# EAGLE board 2026-10-24_14-24-42 (EAGLE 6.4)
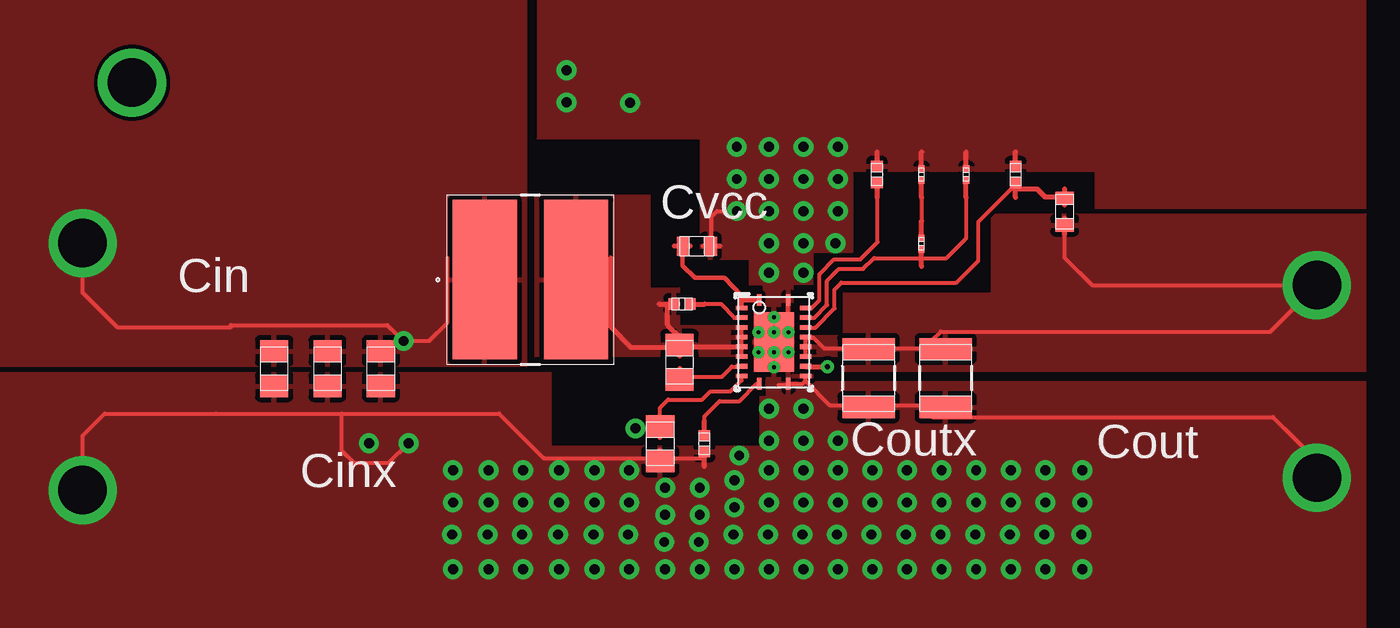
[diagram p0: board, top side]
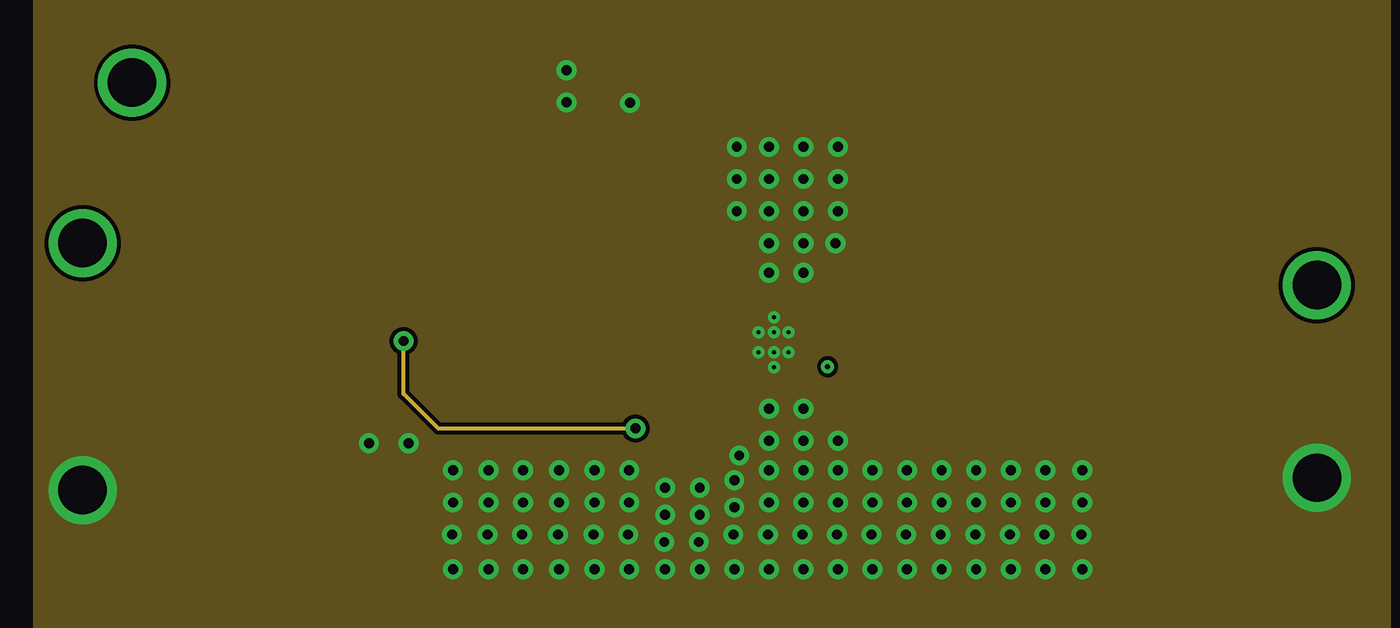
[diagram p1: board, inner layer INTERNAL1]
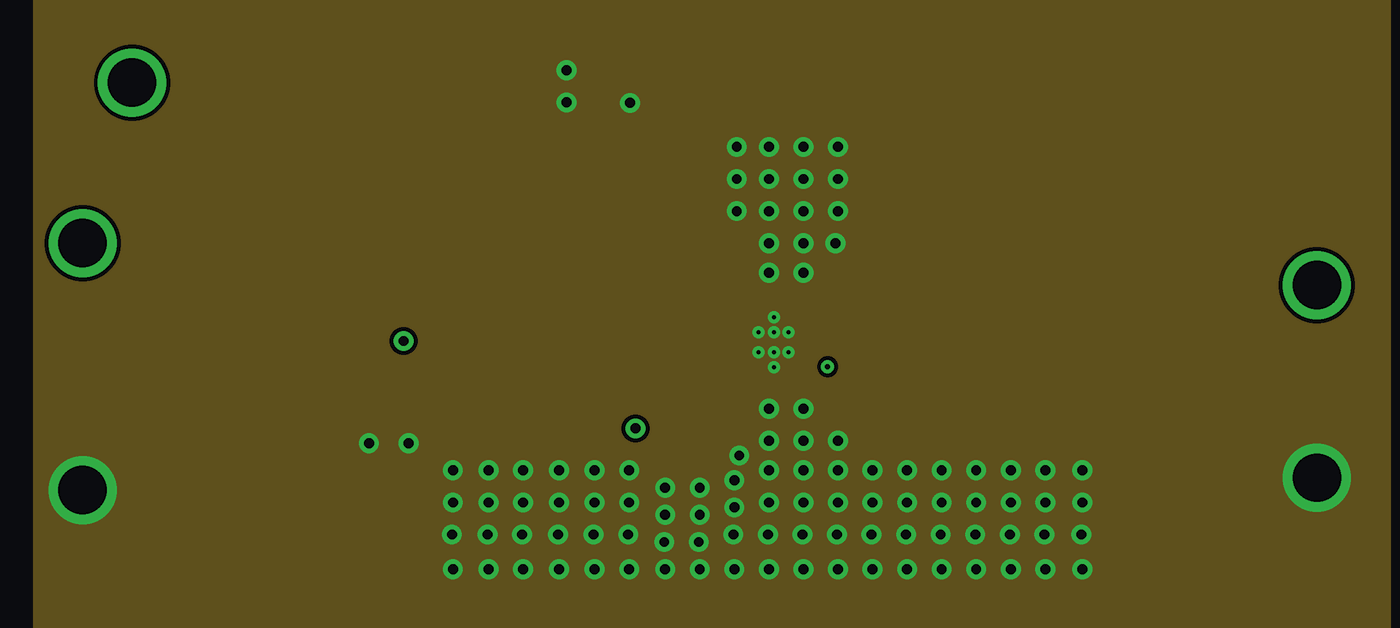
[diagram p2: board, inner layer INTERNAL2]
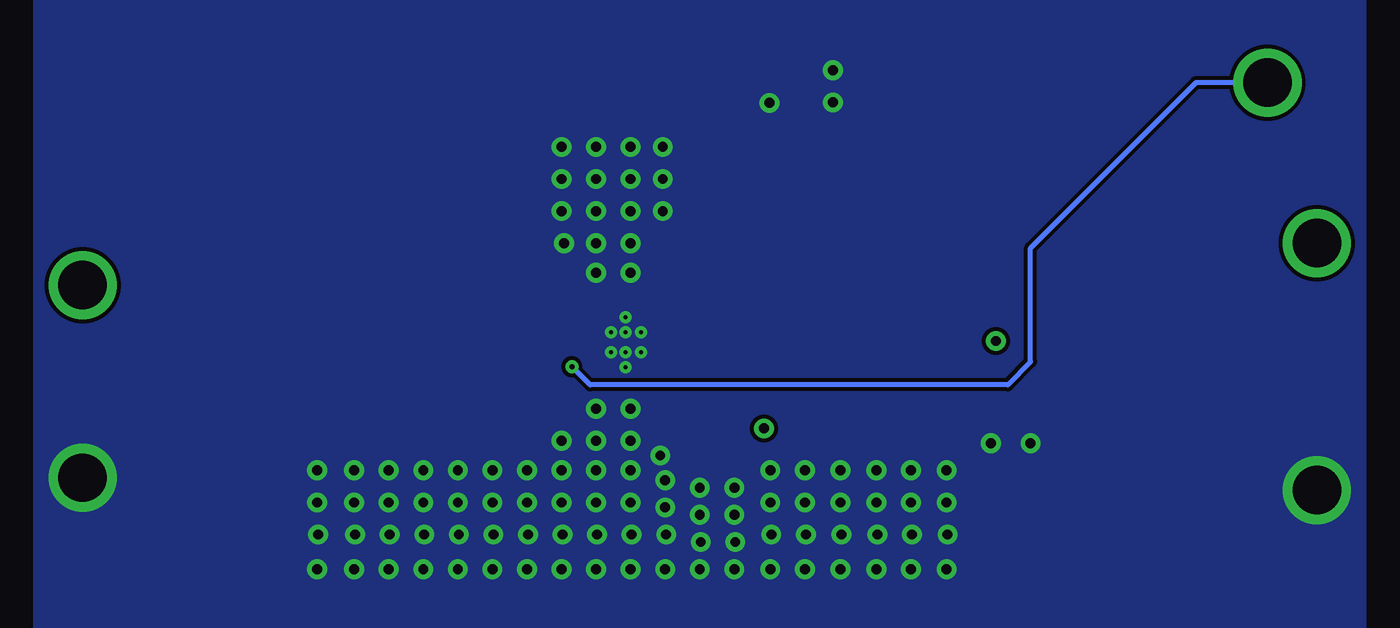
[diagram p3: board, bottom side, seen from below]

No outline drawn. Coordinates in mm, seen from the top.
Copper layers ((1*2)+(15*16)): TOP / INTERNAL1 / layer 15 / BOTTOM

## Footprints (pad centres in the part's own frame; a part is rotated, then mirrored left to right if it is on the bottom)
0805 = smd 1.118 x 1.448: 1 -0.902,0; 2 0.902,0
0201 = smd 0.356 x 0.33: 1 -0.292,0; 2 0.292,0
1210_280 = smd 1.118 x 2.692: 1 -1.499,0; 2 1.499,0
0402 = smd 0.559 x 0.61: 1 -0.419,0; 2 0.419,0
0603 = smd 0.66 x 0.965: 1 -0.699,0; 2 0.699,0
TP-1502 = drill 0.813 pad 1.651 round: 1 0,0
VLP8040 = smd 3.302 x 8.204: 1 -2.349,0; 2 2.349,0
RHL0020A = smd 0.24 x 0.6: 1 -0.75,2.15; 10 -0.75,-2.15; 11 0.75,-2.15; 20 0.75,2.15 | smd 0.6 x 0.24: 2 -1.65,1.75; 3 -1.65,1.25; 4 -1.65,0.75; 5 -1.65,0.25; 6 -1.65,-0.25; 7 -1.65,-0.75; 8 -1.65,-1.25; 9 -1.65,-1.75; 12 1.65,-1.75; 13 1.65,-1.25; 14 1.65,-0.75; 15 1.65,-0.25; 16 1.65,0.25; 17 1.65,0.75; 18 1.65,1.25; 19 1.65,1.75 | smd 2.05 x 3.05: 21 0,0

## Placement (x,y rotation side)
Cbst  [0805]  61.19,52.3 270 top
Ccomp  [0201]  73.63,61.95 90 top
Ccomp2  [0201]  75.95,61.95 90 top
Cin2  [0805]  60.2,48.11 270 top
Cin_1  [0805]  45.82,51.97 270 top
Cin_2  [0805]  43.08,51.97 270 top
Cin_3  [0805]  40.34,51.97 270 top
Cout_1  [1210_280]  70.92,51.49 270 top
Cout_2  [1210_280]  74.88,51.49 270 top
Css  [0402]  62.46,48.11 270 top
Cvcc_1  [0603]  62.08,58.27 0 top
Cvcc_2  [0603]  62.08,58.27 0 top
GND  [TP-1502]  30.45,45.69 0 top
GND1  [TP-1502]  93.95,46.33 0 top
L1  [VLP8040]  53.52,56.54 0 top
MODE  [TP-1502]  32.99,66.67 0 top
Rcomp  [0201]  73.63,58.39 90 top
Rfbb  [0402]  78.49,61.95 90 top
Rfbt  [0603]  81,60.05 90 top
Rlim  [0402]  71.35,61.95 90 top
Rt  [0402]  61.32,55.3 0 top
U1  [RHL0020A]  66.04,53.34 0 top
VIN  [TP-1502]  30.45,58.39 0 top
VOUT  [TP-1502]  93.95,56.24 0 top

## Library data of the parts
Cbst = ultra-librarian; RefDes: Cbst; Type: 08053C104KAT2A
Ccomp = ultra-librarian; RefDes: Ccomp; Type: GRM033R71C681KA01D
Ccomp2 = ultra-librarian; RefDes: Ccomp2; Type: CGA1A2C0G1E330J030BA
Cin2 = ultra-librarian; RefDes: Cin2; Type: 08053C104KAT2A
Cin_1-Cin_3 Cout_1 Cout_2 Cvcc_1 Cvcc_2 = ultra-librarian
Css = ultra-librarian; RefDes: Css; Type: GRM155R71C822KA01D
GND = ultra-librarian; RefDes: GND; Type: TP-1502
GND1 = ultra-librarian; RefDes: GND1; Type: TP-1502
L1 = ultra-librarian; RefDes: L1; Type: VLP8040T-1R0N
MODE = ultra-librarian; RefDes: MODE; Type: TP-1502
Rcomp = ultra-librarian; RefDes: Rcomp; Type: RC0201FR-0728K7L
Rfbb = ultra-librarian; RefDes: Rfbb; Type: CRCW040269K8FKED
Rfbt = ultra-librarian; RefDes: Rfbt; Type: RC0603FR-07220KL
Rlim = ultra-librarian; RefDes: Rlim; Type: CRCW040269K8FKED
Rt = ultra-librarian; RefDes: Rt; Type: CRCW0402267KFKED
U1 = ultra-librarian; RefDes: U1; Type: TPS61088QRHLRQ1
VIN = ultra-librarian; RefDes: VIN; Type: TP-1502
VOUT = ultra-librarian; RefDes: VOUT; Type: TP-1502

## Nets
0: Ccomp2.2 Ccomp.2 Cin2.2 Cin_1.2 Cin_2.2 Cin_3.2 Cout_1.2 Cout_2.2 Css.2 Cvcc_1.2 Cvcc_2.2 GND1.1 GND.1 Rfbb.2 Rlim.2 U1.11 U1.12 U1.20 U1.21
2: Cin2.1 Cin_1.1 Cin_2.1 Cin_3.1 L1.1 U1.9 VIN.1
3: Ccomp.1 Rcomp.2
4: Cvcc_1.1 Cvcc_2.1 U1.1 U1.2
5: Ccomp2.1 Rcomp.1 U1.18
9: Cout_1.1 Cout_2.1 Rfbt.1 U1.14 U1.15 U1.16 VOUT.1
11: Rfbb.1 Rfbt.2 U1.17
12: Cbst.1 L1.2 Rt.1 U1.4 U1.5 U1.6 U1.7
14: Rlim.1 U1.19
15: Rt.2 U1.3
17: MODE.1 U1.13
19: Css.1 U1.10
21: Cbst.2 U1.8

## Tracks (layer width: path | path; a pad name or v marks a point on that pad's centre or on a via)
0  (via drill 0.2 pad 0.48, 0.51 pad 1.02, 2.49 pad 3.48)
  TOP 0.203: v66.04,54.61 66.78,54.61 66.78,55.47 | 43.81,49.66 43.81,47.75 44.45,47.12 46.23,47.12 v47.24,48.13 | 43.81,49.66 37.34,49.66 31.62,49.66 30.48,48.51 v30.48,45.72 | v93.98,46.35 93.98,47.24 91.72,49.48 74.19,49.48 73.58,50.09 71.14,50.09 | 62.48,47.37 60.2,47.37 54.2,47.37 51.92,49.66 43.81,49.66 | v64.14,60.07 63.12,60.07 62.84,59.79 62.84,58.29 | 67.67,51.33 67.51,51.18 66.78,51.18 66.75,51.13 66.29,51.13 | 70.94,50.29 71.14,50.09 | 67.67,51.33 68.91,50.09 71.14,50.09 | 67.67,51.33 | 67.67,51.33 67.67,51.59
  TOP 0.254: 60.19,46.94 60.19,47.78 | 78.47,62.28 78.47,63.12 | 62.47,46.94 62.47,47.78 | 71.36,62.28 71.36,63.12 | 75.93,62.28 75.93,63.12 | 73.65,62.28 73.65,63.12 | 62.41,58.28 63.25,58.28
  other vias: 49.53,41.66 67.56,41.66 65.79,41.66 78.23,41.66 76.45,41.66 80.01,41.66 72.9,41.66 71.12,41.66 74.68,41.66 69.34,41.66 64.01,41.66 81.92,41.66 60.45,41.66 62.23,41.66 56.82,41.66 58.6,41.66 53.14,41.66 51.36,41.66 54.99,41.66 65.79,49.91 67.56,49.91 67.56,48.26 65.79,48.26 67.56,46.74 65.79,46.74 67.56,45.09 65.79,45.09 69.34,48.26 69.34,46.74 74.68,46.74 71.12,46.74 72.9,46.74 80.01,46.74 76.45,46.74 78.23,46.74 78.23,45.09 80.01,45.09 72.9,45.09 71.12,45.09 69.34,45.09 64.01,44.83 64.01,46.23 64.26,47.5 81.92,45.09 81.92,46.74 45.21,48.13 65.79,56.9 67.56,56.9 65.79,58.42 67.56,58.42 67.56,60.07 65.79,60.07 69.34,60.07 69.34,61.72 64.14,61.72 65.79,61.72 67.56,61.72 67.56,63.37 65.79,63.37 64.14,63.37 69.34,63.37 60.45,44.45 62.23,44.45 56.82,45.09 58.6,45.09 58.65,65.63 55.37,67.31 55.37,65.66 69.22,58.42 58.6,46.74 56.82,46.74 62.23,45.85 60.45,45.85 54.99,46.74 51.36,46.74 53.14,46.74 53.14,45.09 51.36,45.09 54.99,45.09 54.94,43.43 51.31,43.43 53.09,43.43 58.55,43.43 56.77,43.43 62.18,43.05 60.4,43.05 81.86,43.43 63.96,43.43 69.29,43.43 74.63,43.43 71.07,43.43 72.85,43.43 79.96,43.43 76.4,43.43 78.18,43.43 65.74,43.43 67.51,43.43 49.48,43.43 49.53,45.09 49.53,46.74 66.8,53.85 66.04,53.85 66.04,52.04 65.25,53.85 74.68,45.09 76.45,45.09 65.25,52.81 66.04,52.81 66.8,52.81
  pour TOP (rank 4): 65.05,51.74 65.61,51.74 65.61,50.93 65.71,50.83 65.81,50.83 65.91,50.93 65.91,51.36 66.14,51.36 66.14,50.93 66.24,50.83 66.34,50.83 66.45,50.93 66.45,51.74 67.01,51.74 67.11,51.84 67.11,54.81 67.01,54.91 66.45,54.91 66.45,55.73 66.34,55.83 66.24,55.83 66.14,55.73 66.14,55.3 65.91,55.3 65.91,55.73 65.81,55.83 65.71,55.83 65.61,55.73 65.61,54.91 65.05,54.91 64.95,54.81 64.95,51.84
  pour TOP: 64.77,56.26 65.48,56.26 65.48,55.09 64.97,55.09 64.97,51.79 65.63,51.79 65.63,50.55 65.3,50.55 65.3,48.01 54.61,48.01 54.61,51.79 26.04,51.79 26.04,30.48 96.52,30.48 96.52,51.31 68.07,51.31 68.07,51.69 67.06,51.69 67.06,56.29 68.07,56.29 68.07,57.94 70.1,57.94 70.1,62.1 82.55,62.1 82.55,60.2 96.52,60.2 96.52,76.2 53.85,76.2 53.85,63.75 62.23,63.75 62.23,57.56 64.77,57.56
  pour BOTTOM (rank 5): 27.94,76.2 96.52,76.2 96.52,30.48 27.94,30.48
  pour INTERNAL2 (rank 6): 27.94,77.47 97.79,77.47 97.79,29.21 27.94,29.21
  pour INTERNAL1: 27.94,77.47 97.79,77.47 97.79,29.21 27.94,29.21
2  (via drill 0.51 pad 1.02, 2.49 pad 3.48)
  TOP 0.203: 49.25,57.66 49.25,54.33 48.31,53.39 v46.99,53.39 | v30.48,58.42 30.48,55.88 32.26,54.1 38.1,54.1 38.1,54.2 46.15,54.2 v46.99,53.39 | U1.9 64.39,51.36 63.8,50.8 62.79,50.8 62.36,50.37 60.6,50.37 60.2,49.96 60.2,48.87 58.93,48.87 v58.93,48.9 | v46.99,53.39 | v46.99,53.39
  TOP 0.254: 60.19,48.44 60.19,49.28
  INTERNAL1 0.203: v46.99,53.39 46.99,50.67 48.77,48.9 v58.93,48.9
  pour TOP (rank 3): 26.04,76.2 53.34,76.2 53.34,52.07 26.04,52.07
3
  TOP 0.203: 73.66,59.16 73.66,61.21 | 73.66,59.16
  TOP 0.254: 73.65,60.78 73.65,61.62 | 73.65,58.73 73.65,59.56
4
  TOP 0.229: 61.34,58.29 61.34,57.25 61.98,56.64 63.5,56.64 64.39,55.73 64.39,55.4 | 65.28,55.47 64.44,55.47 64.39,55.4 | 64.39,55.07 64.39,55.4
  TOP 0.254: 60.91,58.28 61.75,58.28
5
  TOP 0.203: 75.95,61.21 75.95,58.67 74.93,57.66 73.66,57.66 71.2,57.66 70.64,57.1 69.39,57.1 68.78,56.49 68.78,55.24 68.12,54.59 67.67,54.59
  TOP 0.254: 75.93,60.78 75.93,61.62 | 73.65,57.23 73.65,58.06
9  (via drill 2.49 pad 3.48)
  TOP 0.203: 81.03,59.31 81.03,57.66 82.42,56.26 v93.98,56.26 91.59,53.87 74.62,53.87 73.74,53.01 71.14,53.01 68.63,53.01 68.07,53.57 67.67,53.57 67.67,53.09 67.67,52.58
  TOP 0.254: 81.01,58.88 81.01,59.72
  pour TOP: 77.22,59.94 77.22,55.88 69.6,55.88 69.6,53.7 67.41,53.7 67.41,52.58 69.6,52.58 69.6,51.82 96.52,51.82 96.52,59.94
11
  TOP 0.203: 67.67,54.08 68.17,54.08 69.16,55.07 69.16,56.03 69.52,56.39 75.44,56.39 76.56,57.51 76.56,59.51 78.26,61.21 78.49,61.21
  TOP 0.254: 78.49,61.21 79.58,61.21 79.98,60.81 81.03,60.81 | 78.47,60.78 78.47,61.62 | 81.01,60.38 81.01,61.21
12
  TOP 0.203: 64.39,52.58 U1.6 64.39,53.57 64.39,54.08
  TOP 0.254: 57.66,57.66 57.66,54.1 58.67,53.06 61.21,53.06 | 60.58,55.3 60.58,54.2 61.21,53.59 61.21,53.06 | U1.6 61.21,53.09 61.21,53.06 | 60.15,55.28 60.98,55.28 | 61.2,52.63 61.2,53.47
  pour TOP (rank 2): 59.69,56.13 61.21,56.13 61.21,54.2 63.65,54.2 64.64,54.2 64.64,52.58 53.72,52.58 53.72,60.91 59.69,60.91
14
  TOP 0.203: 67.67,55.07 67.97,55.07 68.38,55.47 68.38,56.82 69.14,57.58 70.48,57.58 71.37,58.47 71.37,61.21
  TOP 0.254: 71.36,60.78 71.36,61.62
15
  TOP 0.203: 62.08,55.3 63.32,55.3 64.01,54.59 U1.3
  TOP 0.254: 61.65,55.28 62.48,55.28
17  (via drill 0.25 pad 0.51, 2.49 pad 3.48)
  TOP 0.254: 67.67,52.07 v68.81,52.07
  BOTTOM 0.254: 33.15,66.8 v33.02,66.67 36.7,66.67 45.21,58.17 45.21,52.32 46.38,51.13 67.87,51.13 v68.81,52.07
19
  TOP 0.203: 62.48,48.87 62.48,49.53 63.25,50.29 64.26,50.29 65.15,51.18 65.28,51.18
  TOP 0.254: 62.47,48.44 62.47,49.28
21
  TOP 0.203: 61.21,51.56 63.37,51.56 63.88,52.07 64.39,52.07
  TOP 0.254: 61.2,51.13 61.2,51.97

## Text on the board
ASSYNOTES: Cvcc | Cin | Coutx | Cout | Cinx | Note: | For PFM mode Connect mode TP to GND TP. | For PWM mode Connect mode TP to Vin TP.